# Allegro board demo_ver_17p2.brd
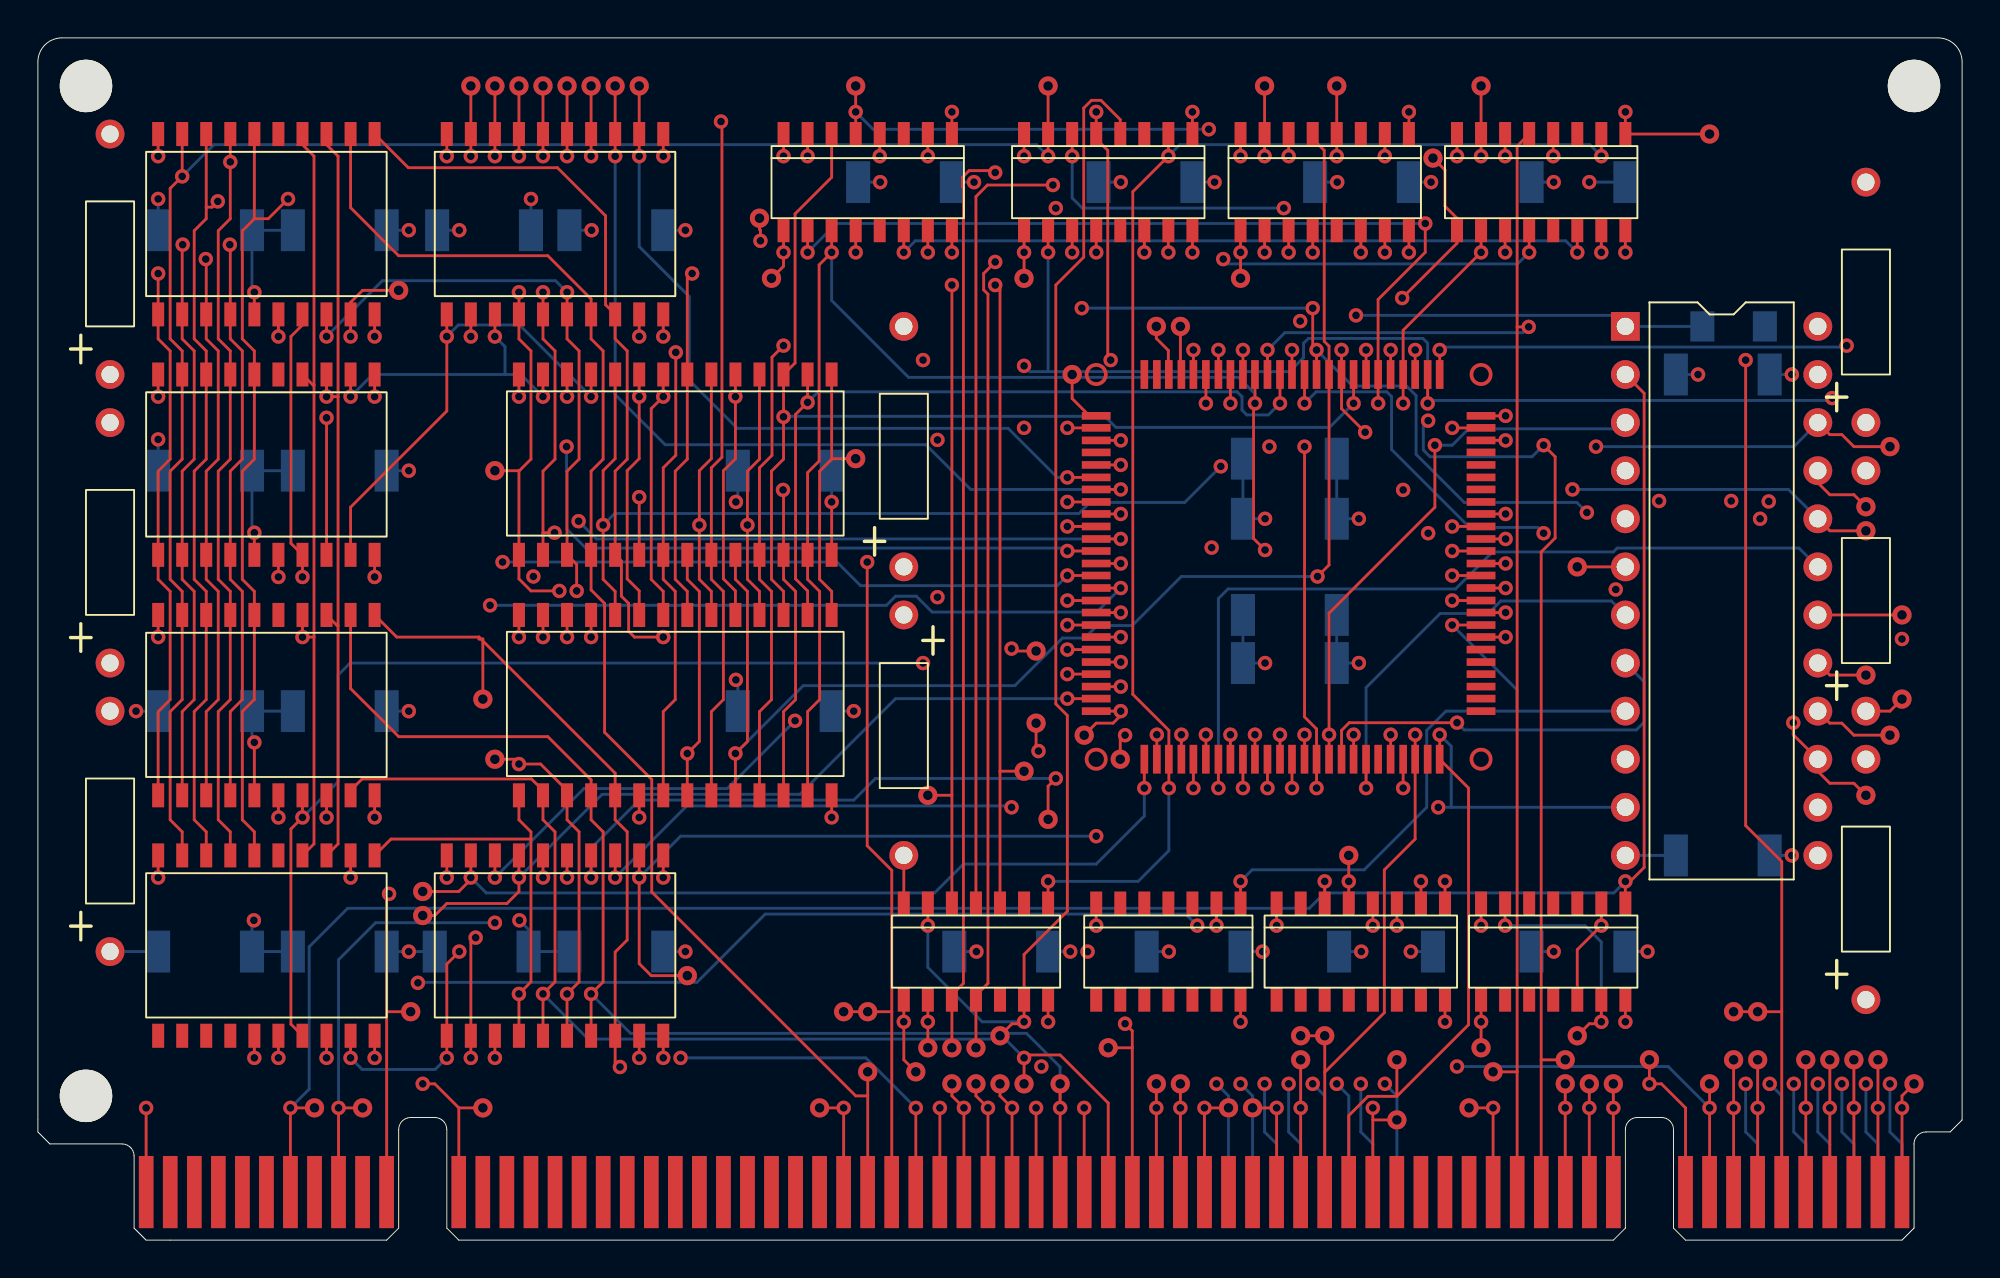
[diagram p0: board, top side]
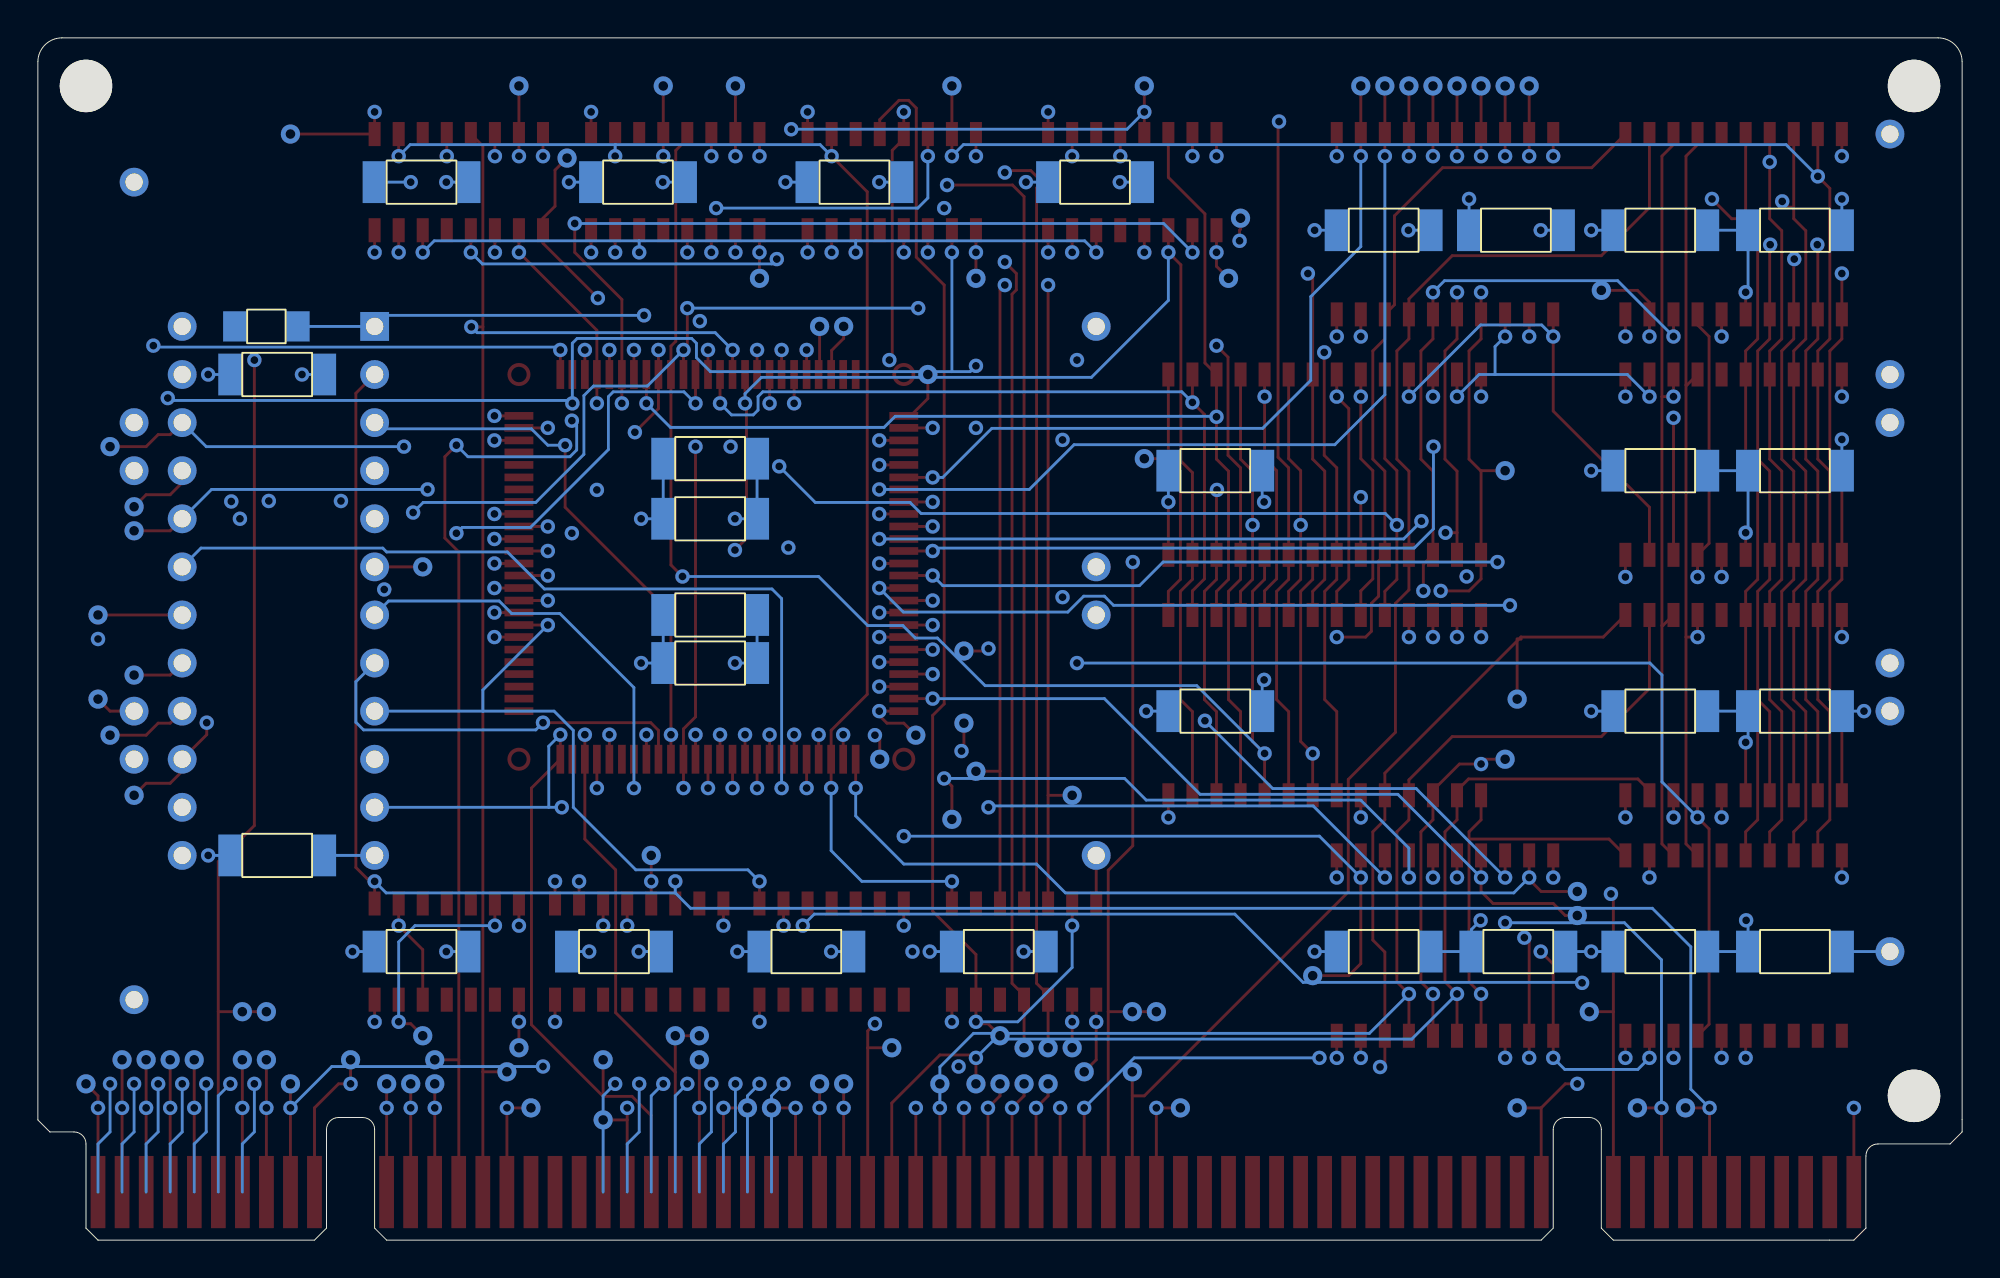
[diagram p1: board, bottom side, seen from below]

Outline 101.6 x 63.5 mm; copper layers: TOP, GND, IS3, IS4, VCC, BOTTOM. Coordinates in mm from the lower left corner of the outline.
Outline path: 0,62.23 arc(0.37,63.13) 1.27,63.5 100.33,63.5 arc(101.23,63.13) 101.6,62.23 101.6,6.35 100.97,5.71 99.7,5.71 arc(99.25,5.53) 99.06,5.08 99.06,0.63 98.43,0 87,0 86.36,0.63 86.36,5.84 arc(86.17,6.29) 85.73,6.48 84.46,6.48 arc(84.01,6.29) 83.82,5.84 83.82,0.63 83.19,0 22.22,0 21.59,0.63 21.59,5.84 arc(21.4,6.29) 20.95,6.48 19.68,6.48 arc(19.24,6.29) 19.05,5.84 19.05,0.63 18.41,0 5.71,0 5.08,0.63 5.08,4.45 arc(4.89,4.89) 4.45,5.08 0.64,5.08 0,5.71 0,62.23

## Design rules (mm)
constraint set DEFAULT: min track width 0.152

## Placement (name value [footprint] x y rotation side)
C1  0.01UF  [SMDCAP]  23.49 53.34 180 bottom
C2  0.01UF  [SMDCAP]  15.88 40.64 180 bottom
C3  0.01UF  [SMDCAP]  15.88 27.94 180 bottom
C4  0.01UF  [SMDCAP]  15.88 53.34 180 bottom
C5  0.01UF  [SMDCAP]  15.88 15.24 180 bottom
C6  0.01UF  [SMDCAP]  88.9 20.32 180 bottom
C7  0.01UF  [SMDCAP]  23.49 15.24 0 bottom
C8  0.01UF  [SMDCAP]  66.04 30.48 180 bottom
C9  0.01UF  [SMDCAP]  66.04 41.27 180 bottom
C10  0.01UF  [SMDCAP]  8.89 53.34 0 bottom
C11  0.01UF  [SMDCAP]  8.89 40.64 0 bottom
C12  0.01UF  [SMDCAP]  8.89 27.94 0 bottom
C13  0.01UF  [SMDCAP]  8.89 15.24 0 bottom
C14  0.01UF  [SMDCAP]  30.48 15.24 180 bottom
C15  0.01UF  [SMDCAP]  30.48 53.34 180 bottom
C16  0.01UF  [SMDCAP]  39.37 40.64 180 bottom
C17  0.01UF  [SMDCAP]  39.37 27.94 180 bottom
C18  0.01UF  [SMDCAP]  66.04 38.1 180 bottom
C19  0.01UF  [SMDCAP]  66.04 33.02 180 bottom
C20  0.01UF  [SMDCAP]  50.8 15.24 180 bottom
C21  0.022UF  [CAP400]  45.72 30.48 180 top
C22  0.022UF  [CAP400]  45.72 38.1 0 top
C23  0.022UF  [CAP400]  96.52 15.24 0 top
C24  0.022UF  [CAP400]  96.52 30.48 0 top
C25  0.022UF  [CAP400]  96.52 45.72 0 top
C26  0.022UF  [CAP400]  3.81 48.26 0 top
C27  0.022UF  [CAP400]  3.81 33.02 0 top
C28  0.022UF  [CAP400]  3.81 17.78 0 top
C29  1UF  [SMDCAP]  60.96 15.24 180 bottom
C30  1UF  [SMDCAP]  71.12 15.24 180 bottom
C31  1UF  [SMDCAP]  81.28 15.24 180 bottom
C32  1UF  [SMDCAP]  45.72 55.88 180 bottom
C33  1UF  [SMDCAP]  58.42 55.88 180 bottom
C34  1UF  [SMDCAP]  69.85 55.88 180 bottom
C35  1UF  [SMDCAP]  81.28 55.88 180 bottom
C36  1UF  [SMDCAP]  88.9 45.72 180 bottom
J1  -  [CONN140]  98.43 2.54 0 top
NOREF  -  [unnamed]  2.54 7.62 0 top
NOREF#2  -  [unnamed]  99.06 60.96 0 top
NOREF#3  -  [unnamed]  2.54 60.96 0 top
R1  10  [SMDRES]  89.54 48.26 180 bottom
U1  ***  [SOIC20W]  12.07 53.97 270 top
U2  ***  [SOIC20W]  12.07 41.27 270 top
U3  ***  [SOIC20W]  12.07 28.57 270 top
U4  ***  [SOIC20W]  12.07 15.88 270 top
U5  ***  [SOIC14]  59.69 15.24 270 top
U6  ***  [SOIC14]  49.53 15.24 270 top
U7  ***  [SOIC16]  69.85 15.24 270 top
U8  ***  [SOIC20W]  27.3 53.97 270 top
U9  ***  [SOIC20W]  27.3 15.88 270 top
U10  ***  [SOIC16]  43.81 55.88 270 top
U11  ***  [SOIC16]  79.38 55.88 270 top
U12  ***  [SOIC16]  56.52 55.88 270 top
U13  ***  [SOIC16]  67.95 55.88 270 top
U14  ***  [SOIC14]  80.01 15.24 270 top
U15  ***  [DIP24_4]  83.82 48.26 0 top
U16  ***  [SOIC28W]  33.66 41.27 270 top
U17  -  [FLAT100]  58.42 25.4 270 top
U18  ***  [SOIC28W]  33.66 28.57 270 top

## Library data of the parts
C1-C20 = CAP-.01UF: User Part Number: 1206; Tolerance: ***
C21-C28 = CAP-22UF: User Part Number: 21505-274-01; Tolerance: ***
C29-C36 = CAP-1UF: User Part Number: 21503-260-12; Tolerance: ***
J1 = CONN140-1
R1 = PRES-10: User Part Number: 24707-008-01; Tolerance: ***
U1-U4 = M5M44C256P-10-1
U5 = 74F04-1
U6 U14 = 74F393-1
U7 = 74F109-1
U8 U9 = 74F245-1
U10-U13 = 74F153-1
U15 = MEMPAL-1
U16 U18 = 27C256-1
U17 = I80386S-1

## Footprints (pads in the part's own frame, mm; a bottom-side part is the same pattern mirrored in y, then rotated)
CAP400
  round 1.524 hole 0.914: 1(0,-2.54) 2(0,10.16)
CONN140
  rect 0.762x3.81 smd: 1(0,0) 2(-1.27,0) 3(-2.54,0) 4(-3.81,0) 5(-5.08,0) 6(-6.35,0) 7(-7.62,0) 8(-8.89,0) 9(-10.16,0) 10(-11.43,0) 11(-15.24,0) 12(-16.51,0) 13(-17.78,0) 14(-19.05,0) 15(-20.32,0) 16(-21.59,0) 17(-22.86,0) 18(-24.13,0) 19(-25.4,0) 20(-26.67,0) 21(-27.94,0) 22(-29.21,0) 23(-30.48,0) 24(-31.75,0) 25(-33.02,0) 26(-34.29,0) 27(-35.56,0) 28(-36.83,0) 29(-38.1,0) 30(-39.37,0) 31(-40.64,0) 32(-41.91,0) 33(-43.18,0) 34(-44.45,0) 35(-45.72,0) 36(-46.99,0) 37(-48.26,0) 38(-49.53,0) 39(-50.8,0) 40(-52.07,0) 41(-53.34,0) 42(-54.61,0) 43(-55.88,0) 44(-57.15,0) 45(-58.42,0) 46(-59.69,0) 47(-60.96,0) 48(-62.23,0) 49(-63.5,0) 50(-64.77,0) 51(-66.04,0) 52(-67.31,0) 53(-68.58,0) 54(-69.85,0) 55(-71.12,0) 56(-72.39,0) 57(-73.66,0) 58(-74.93,0) 59(-76.2,0) 60(-80.01,0) 61(-81.28,0) 62(-82.55,0) 63(-83.82,0) 64(-85.09,0) 65(-86.36,0) 66(-87.63,0) 67(-88.9,0) 68(-90.17,0) 69(-91.44,0) 70(-92.71,0) 71(0,0) 72(-1.27,0) 73(-2.54,0) 74(-3.81,0) 75(-5.08,0) 76(-6.35,0) 77(-7.62,0) 78(-8.89,0) 79(-10.16,0) 80(-11.43,0) 81(-15.24,0) 82(-16.51,0) 83(-17.78,0) 84(-19.05,0) 85(-20.32,0) 86(-21.59,0) 87(-22.86,0) 88(-24.13,0) 89(-25.4,0) 90(-26.67,0) 91(-27.94,0) 92(-29.21,0) 93(-30.48,0) 94(-31.75,0) 95(-33.02,0) 96(-34.29,0) 97(-35.56,0) 98(-36.83,0) 99(-38.1,0) 100(-39.37,0) 101(-40.64,0) 102(-41.91,0) 103(-43.18,0) 104(-44.45,0) 105(-45.72,0) 106(-46.99,0) 107(-48.26,0) 108(-49.53,0) 109(-50.8,0) 110(-52.07,0) 111(-53.34,0) 112(-54.61,0) 113(-55.88,0) 114(-57.15,0) 115(-58.42,0) 116(-59.69,0) 117(-60.96,0) 118(-62.23,0) 119(-63.5,0) 120(-64.77,0) 121(-66.04,0) 122(-67.31,0) 123(-68.58,0) 124(-69.85,0) 125(-71.12,0) 126(-72.39,0) 127(-73.66,0) 128(-74.93,0) 129(-76.2,0) 130(-80.01,0) 131(-81.28,0) 132(-82.55,0) 133(-83.82,0) 134(-85.09,0) 135(-86.36,0) 136(-87.63,0) 137(-88.9,0) 138(-90.17,0) 139(-91.44,0) 140(-92.71,0)
DIP24_4
  rect 1.524x1.524 hole 0.914: 1(0,0)
  round 1.524 hole 0.914: 2(0,-2.54) 3(0,-5.08) 4(0,-7.62) 5(0,-10.16) 6(0,-12.7) 7(0,-15.24) 8(0,-17.78) 9(0,-20.32) 10(0,-22.86) 11(0,-25.4) 12(0,-27.94) 13(10.16,-27.94) 14(10.16,-25.4) 15(10.16,-22.86) 16(10.16,-20.32) 17(10.16,-17.78) 18(10.16,-15.24) 19(10.16,-12.7) 20(10.16,-10.16) 21(10.16,-7.62) 22(10.16,-5.08) 23(10.16,-2.54) 24(10.16,0)
FLAT100
  rect 1.524x0.406 smd: 1(0,0) 2(0,0.66) 3(0,1.295) 4(0,1.956) 5(0,2.591) 6(0,3.251) 7(0,3.912) 8(0,4.547) 9(0,5.207) 10(0,5.842) 11(0,6.502) 12(0,7.163) 13(0,7.798) 14(0,8.458) 15(0,9.093) 16(0,9.754) 17(0,10.414) 18(0,11.049) 19(0,11.709) 20(0,12.344) 21(0,13.005) 22(0,13.665) 23(0,14.3) 24(0,14.961) 25(0,15.596) 51(-20.32,15.596) 52(-20.32,14.961) 53(-20.32,14.3) 54(-20.32,13.665) 55(-20.32,13.005) 56(-20.32,12.344) 57(-20.32,11.709) 58(-20.32,11.049) 59(-20.32,10.414) 60(-20.32,9.754) 61(-20.32,9.093) 62(-20.32,8.458) 63(-20.32,7.798) 64(-20.32,7.163) 65(-20.32,6.502) 66(-20.32,5.842) 67(-20.32,5.207) 68(-20.32,4.547) 69(-20.32,3.912) 70(-20.32,3.251) 71(-20.32,2.591) 72(-20.32,1.956) 73(-20.32,1.295) 74(-20.32,0.66) 75(-20.32,0)
  rect 0.406x1.524 smd: 26(-2.54,17.78) 27(-3.2,17.78) 28(-3.835,17.78) 29(-4.496,17.78) 30(-5.131,17.78) 31(-5.791,17.78) 32(-6.452,17.78) 33(-7.087,17.78) 34(-7.747,17.78) 35(-8.382,17.78) 36(-9.042,17.78) 37(-9.703,17.78) 38(-10.338,17.78) 39(-10.998,17.78) 40(-11.633,17.78) 41(-12.294,17.78) 42(-12.954,17.78) 43(-13.589,17.78) 44(-14.249,17.78) 45(-14.884,17.78) 46(-15.545,17.78) 47(-16.205,17.78) 48(-16.84,17.78) 49(-17.501,17.78) 50(-18.136,17.78) 76(-18.136,-2.54) 77(-17.501,-2.54) 78(-16.84,-2.54) 79(-16.205,-2.54) 80(-15.545,-2.54) 81(-14.884,-2.54) 82(-14.249,-2.54) 83(-13.589,-2.54) 84(-12.954,-2.54) 85(-12.294,-2.54) 86(-11.633,-2.54) 87(-10.998,-2.54) 88(-10.338,-2.54) 89(-9.703,-2.54) 90(-9.042,-2.54) 91(-8.382,-2.54) 92(-7.747,-2.54) 93(-7.087,-2.54) 94(-6.452,-2.54) 95(-5.791,-2.54) 96(-5.131,-2.54) 97(-4.496,-2.54) 98(-3.835,-2.54) 99(-3.2,-2.54) 100(-2.54,-2.54)
SMDCAP
  rect 1.27x2.21 smd: 1(-2.54,0) 2(2.413,0)
SMDRES
  rect 1.27x1.6 smd: 1(-1.651,0) 2(1.651,0)
SOIC14
  rect 1.27x0.635 smd: 1(-2.54,3.81) 2(-2.54,2.54) 3(-2.54,1.27) 4(-2.54,0) 5(-2.54,-1.27) 6(-2.54,-2.54) 7(-2.54,-3.81) 8(2.54,-3.81) 9(2.54,-2.54) 10(2.54,-1.27) 11(2.54,0) 12(2.54,1.27) 13(2.54,2.54) 14(2.54,3.81)
SOIC16
  rect 1.27x0.635 smd: 1(-2.54,4.445) 2(-2.54,3.175) 3(-2.54,1.905) 4(-2.54,0.635) 5(-2.54,-0.635) 6(-2.54,-1.905) 7(-2.54,-3.175) 8(-2.54,-4.445) 9(2.54,-4.445) 10(2.54,-3.175) 11(2.54,-1.905) 12(2.54,-0.635) 13(2.54,0.635) 14(2.54,1.905) 15(2.54,3.175) 16(2.54,4.445)
SOIC20W
  rect 1.27x0.635 smd: 1(-4.445,5.715) 2(-4.445,4.445) 3(-4.445,3.175) 4(-4.445,1.905) 5(-4.445,0.635) 6(-4.445,-0.635) 7(-4.445,-1.905) 8(-4.445,-3.175) 9(-4.445,-4.445) 10(-4.445,-5.715) 11(5.08,-5.715) 12(5.08,-4.445) 13(5.08,-3.175) 14(5.08,-1.905) 15(5.08,-0.635) 16(5.08,0.635) 17(5.08,1.905) 18(5.08,3.175) 19(5.08,4.445) 20(5.08,5.715)
SOIC28W
  rect 1.27x0.635 smd: 1(-4.445,8.255) 2(-4.445,6.985) 3(-4.445,5.715) 4(-4.445,4.445) 5(-4.445,3.175) 6(-4.445,1.905) 7(-4.445,0.635) 8(-4.445,-0.635) 9(-4.445,-1.905) 10(-4.445,-3.175) 11(-4.445,-4.445) 12(-4.445,-5.715) 13(-4.445,-6.985) 14(-4.445,-8.255) 15(5.08,-8.255) 16(5.08,-6.985) 17(5.08,-5.715) 18(5.08,-4.445) 19(5.08,-3.175) 20(5.08,-1.905) 21(5.08,-0.635) 22(5.08,0.635) 23(5.08,1.905) 24(5.08,3.175) 25(5.08,4.445) 26(5.08,5.715) 27(5.08,6.985) 28(5.08,8.255)
unnamed
  round 2.769 hole 2.769 unplated: (0,0)

## Nets
GND: C1.2(B<0>) C2.2(B<0>) C3.2(B<0>) C4.2(B<0>) C5.2(B<0>) C6.2(B<0>) C7.2(B<0>) C8.2(B<0>) C9.2(B<0>) C10.2(B<0>) C11.2(B<0>) C12.2(B<0>) C13.2(B<0>) C14.2(B<0>) C15.2(B<0>) C16.2(B<0>) C17.2(B<0>) C18.2(B<0>) C19.2(B<0>) C20.2(B<0>) C21.2(B<0>) C22.2(B<0>) C23.2(B<0>) C24.2(B<0>) C25.2(B<0>) C26.2(B<0>) C27.2(B<0>) C28.2(B<0>) C29.2(B<0>) C30.2(B<0>) C31.2(B<0>) C32.2(B<0>) C33.2(B<0>) C34.2(B<0>) C35.2(B<0>) C36.2(B<0>) J1.90 J1.91 J1.92 J1.93 J1.94 J1.95 J1.96 J1.97 U1.15 U1.16 U1.20 U2.15 U2.16 U2.20 U3.15 U3.16 U3.20 U4.15 U4.16 U4.20 U5.7 U6.7 U7.3 U7.8 U8.10 U8.19 U9.10 U9.19 U10.1 U10.8 U10.15 U11.1 U11.8 U11.15 U12.1 U12.8 U12.15 U13.1 U13.8 U13.15 U14.7 U15.12 U15.13 U16.14 U16.20 U17.2 U17.5 U17.11 U17.12 U17.13 U17.14 U17.22 U17.35 U17.37 U17.38 U17.40 U17.41 U17.49 U17.50 U17.63 U17.67 U17.68 U17.77 U17.78 U17.85 U17.98 U18.14 U18.20
VCC: C1.1 C2.1 C3.1 C4.1 C5.1 C6.1 C7.1 C8.1 C9.1 C10.1 C11.1 C12.1 C13.1 C14.1 C15.1 C16.1 C17.1 C18.1 C19.1 C20.1 C21.1 C22.1 C23.1 C24.1 C25.1 C26.1 C27.1 C28.1 C29.1 C30.1 C31.1 C32.1 C33.1 C34.1 C35.1 C36.1 J1.70 J1.71 J1.72 J1.73 J1.74 J1.75 J1.76 J1.77 U1.10 U2.10 U3.10 U4.10 U5.14 U6.14 U7.1 U7.2 U7.16 U8.20 U9.20 U10.16 U11.16 U12.16 U13.16 U14.14 U15.24 U16.28 U17.6 U17.8 U17.9 U17.10 U17.21 U17.32 U17.34 U17.36 U17.39 U17.42 U17.48 U17.57 U17.69 U17.71 U17.84 U17.91 U17.97 U18.28
A1: J1.2 U13.10 U16.10 U17.18 U18.10
A2: J1.3 U13.6 U16.9 U17.51 U18.9
A3: J1.4 U12.10 U16.8 U17.52 U18.8
A4: J1.5 U12.6 U16.7 U17.53 U18.7
A5: J1.6 U11.10 U16.6 U17.54 U18.6
A6: J1.7 U11.6 U16.5 U17.55 U18.5
A7: J1.8 U10.10 U16.4 U17.56 U18.4
A8: J1.9 U10.6 U16.3 U17.58 U18.3
A9: J1.10 U13.11 U16.25 U17.59 U18.25
A10: J1.11 U13.5 U16.24 U17.60 U18.24
A11: J1.12 U12.11 U16.21 U17.61 U18.21
A12: J1.13 U12.5 U16.23 U17.62 U18.23
A13: J1.14 U11.11 U16.2 U17.64 U18.2
A14: J1.15 U11.5 U16.26 U17.65 U18.26
A15: J1.16 U10.11 U16.27 U17.66 U18.27
A16: U10.5 U17.70
A17: U17.72
A18: U17.73
A19: U17.74
A20: U17.75
A21: U17.76
A22: U17.79
A23: U15.6 U17.80
ADDR0: U1.6 U2.6 U3.6 U4.6 U13.9(Y<0>)
ADDR1: U1.7 U2.7 U3.7 U4.7 U13.7
ADDR2: U1.8 U2.8 U3.8 U4.8 U12.9(Y<0>)
ADDR3: U1.9 U2.9 U3.9 U4.9 U12.7
ADDR4: U1.11 U2.11 U3.11 U4.11 U11.9(Y<0>)
ADDR5: U1.12 U2.12 U3.12 U4.12 U11.7
ADDR6: U1.13 U2.13 U3.13 U4.13 U10.9(Y<0>)
ADDR7: U1.14 U2.14 U3.14 U4.14 U10.7
ADSL: J1.24 U15.3 U17.16
BHEL: J1.21 U15.7 U17.19
BLEL: J1.1(P<0>) U15.8 U17.17
CAS0L: U3.17 U4.17 U15.17
CAS1L: U1.17 U2.17 U15.18
CLK2: J1.62 R1.2(B<0>) U7.4 U15.1 U17.15
CLRCNT: U14.2 U14.12 U15.21
D0: U9.9 U17.1
D1: U9.8 U17.100
D2: U9.7 U17.99
D3: U9.6 U17.96
D4: U9.5 U17.95
D5: U9.4 U17.94
D6: U9.3 U17.93
D7: U9.2 U17.92
D8: U8.9 U17.90
D9: U8.8 U17.89
D10: U8.7 U17.88
D11: U8.6 U17.87
D12: U8.5 U17.86
D13: U8.4 U17.83
D14: U8.3 U17.82
D15: U8.2 U17.81
DATA0: J1.28 U4.19(DQ<0>) U9.11(B<0>) U18.11
DATA1: J1.29 U4.18 U9.12 U18.12
DATA2: J1.30 U4.2 U9.13 U18.13
DATA3: J1.31 U4.1 U9.14 U18.15
DATA4: J1.32 U3.19(DQ<0>) U9.15 U18.16
DATA5: J1.33 U3.18 U9.16 U18.17
DATA6: J1.34 U3.2 U9.17 U18.18
DATA7: J1.35 U3.1 U9.18 U18.19
DATA8: J1.36 U2.19(DQ<0>) U8.11(B<0>) U16.11
DATA9: J1.37 U2.18 U8.12 U16.12
DATA10: J1.38 U2.2 U8.13 U16.13
DATA11: J1.39 U2.1 U8.14 U16.15
DATA12: J1.40 U1.19(DQ<0>) U8.15 U16.16
DATA13: J1.41 U1.18 U8.16 U16.17
DATA14: J1.42 U1.2 U8.17 U16.18
DATA15: J1.43 U1.1 U8.18 U16.19
HLDA: J1.25 U6.1 U10.2 U11.2 U12.2 U13.2 U15.4 U17.3
MIO: J1.23 U15.5 U17.23
MUXS0L: U10.14 U11.14 U12.14 U13.14 U15.20
PCLK: J1.64 U7.6 U14.1 U15.2
RA0: U6.3 U13.12
RA1: U6.4 U13.4
RA2: U6.5 U12.12
RA3: U6.6 U6.13 U12.4
RA4: U6.11 U11.12
RA5: U6.10 U11.4
RA6: U6.9 U10.12
RA7: U6.8(Q<3>) U10.4
RASL: U1.4 U2.4 U3.4 U4.4 U15.16
RDYL: J1.60 U15.19 U17.7
REF: U14.8(Q<3>) U15.10 U17.4
RESET: J1.59 U5.1 U15.9 U17.33(RESET)
RESETL: U5.2 U7.5
ROMOEL: U15.15 U16.22 U18.22
UN1F39330PQ0: U14.6 U14.13
UN1OSC1PB0: R1.1
UN127C25637PVPP0: U16.1(VPP) U18.1(VPP)
WEL: U1.3 U2.3 U3.3 U4.3 U15.22
WR: J1.22 U8.1 U9.1 U15.11(I<9>) U17.25

Pads without a net: J1 17 18 19 20 26 27 44 45 46 47 48 49 50 51 52 53 54 55 56 57 58 61 63 65 66 67 68 69 78 79 80 81 82 83 84 85 86 87 88 89 98 99 100 101 102 103 104 105 106 107 108 109 110 111 112 113 114 115 116 117 118 119 120 121 122 123 124 125 126 127 128 129 130 131 132 133 134 135 136 137 138 139 140; U1 5; U2 5; U3 5; U4 5; U5 3 4 5 6 8 9 10 11 12 13; U6 2 12; U7 7 9 10 11 12 13 14 15; U10 3 13; U11 3 13; U12 3 13; U13 3 13; U14 3 4 5 9 10 11; U15 14 23; U17 20 24 26 27 28 29 30 31 43 44 45 46 47

## Via types
v1: diameter 0.762, hole 0.406, TOP to BOTTOM, 426 vias
v2: diameter 1.016, hole 0.508, TOP to BOTTOM, 94 vias

## Routing (per net, layer and track width the routed paths; a pad name or vN(x,y) marks a point on that pad's centre or on a via; arc(x,y) is an arc through that point)
GND: length 180.1
  TOP w0.152: v1(21.59,57.25) U8.10 ; v1(61.01,23.88) U17.5 ; v1(25.4,31.85) U18.14 ; v1(39.37,57.25) U10.8 ; v1(12.7,35.03) U2.16 ; v1(25.4,44.55) U16.14 ; U12.1 v1(60.96,59.59) ; v1(65.41,16.61) U7.8 ; U2.15 v1(11.43,37.36) ; v1(12.7,47.73) U1.16 ; v1(74.68,33.78) U17.35 ; v1(21.59,19.15) U9.10 ; v1(46.99,52.17) U10.15 ; v1(12.7,22.33) 12.7,23.5 ; v1(83.82,59.59) U11.1 v2(88.27,58.42) ; U17.38 v1(77.5,35.74) ; v1(55.88,16.61) U5.7 ; v1(62.97,44.2) U17.68 ; v1(12.7,9.63) U4.16 ; v1(64.92,23.88) U17.11 ; U16.20 v1(31.75,39.24) ; U17.50 v1(77.5,43.54) ; U1.15 v1(11.43,50.06) ; v1(74.68,37.69) U17.41 ; v1(63.5,57.25) U13.8 ; U6.7 C21.2 ; v1(76.2,16.61) U14.7 ; U13.1 v1(72.39,59.59) ; v1(74.68,35.1) U17.37 ; v1(54.36,42.9) U17.77 ; v1(17.78,47.73) U1.20 ; U17.98 v1(57.18,29.24) ; v1(11.43,9.63) U4.15 ; v1(72.09,23.88) U17.22 ; v1(31.75,9.63) U9.19 ; v1(54.36,37.69) U17.85 ; v1(74.68,42.9) U17.49 ; v1(17.78,35.03) U2.20 ; v1(17.78,9.63) U4.20 ; U17.14 v1(66.88,26.7) ; v1(74.93,57.25) U11.8 ; v1(59.69,52.17) U12.15 ; v1(71.12,52.17) U13.15 ; U10.1 v1(48.26,59.59) ; v1(31.75,47.73) U8.19 ; v1(31.75,22.33) 31.75,23.5 ; U17.78 v1(57.18,42.24) ; U17.12 v1(65.58,26.7) ; U17.2 v1(59.08,26.7) ; v1(71.76,16.61) U7.3 ; v1(82.55,52.17) U11.15 ; U17.67 v1(63.63,47.02) ; U17.63 v1(66.22,47.02) ; v1(52.07,57.25) U12.8 ; v1(66.22,23.88) U17.13 ; v1(17.78,22.33) 17.78,23.5 ; U17.40 v1(77.5,37.03) ; 11.43,23.5 v1(11.43,26.29)
  GND w0.152: v1(36.86,29.59) 36.96,29.59 ; 11.3,16.89 v1(11.4,16.89) ; v1(36.86,38.99) 36.96,38.99
  BOTTOM w0.152: C14.2 C7.2 25.91,16.41 v1(25.43,16.89) ; v1(63.5,8.26) 64.14,7.62 J1.96 ; C4.2 C10.2 11.3,50.19 v1(11.43,50.06) ; C34.2 v1(68.61,55.88) ; C33.2 v1(57.18,55.88) ; J1.97 62.87,7.62 v1(62.23,8.26) ; J1.94 66.68,5.08 66.04,5.71 v1(66.04,8.26) ; C9.2 C18.2 v1(64.8,38.1) ; C16.2 36.96,39.09 v1(36.86,38.99) ; C20.2 v1(49.56,15.24) ; C17.2 36.96,29.49 v1(36.86,29.59) ; J1.95 65.41,5.08 64.77,5.71 v1(64.77,8.26) ; J1.92 69.22,7.62 v1(68.58,8.26) ; C30.2 v1(69.88,15.24) ; C32.2 v1(44.48,55.88) ; C5.2 C13.2 11.3,16.79 v1(11.4,16.89) ; 70.48,2.54 70.48,5.08 69.85,5.71 v1(69.85,8.26) ; v1(67.31,8.26) 67.95,7.62 J1.93 ; C1.2 v1(22.25,53.34) ; C31.2 v1(80.04,15.24) ; C15.2 v1(29.24,53.34) ; v1(11.43,26.29) 11.3,26.42 C12.2 C3.2 ; U15.12 C6.2 ; J1.90 71.76,7.62 v1(71.12,8.26) ; v1(11.43,37.36) 11.3,37.49 C11.2 C2.2 ; v1(64.8,30.48) C8.2 C19.2 ; C29.2 v1(59.72,15.24) ; C36.2 v1(87.66,45.72) ; C35.2 v1(80.04,55.88)
VCC: length 134.4
  TOP w0.152: v1(83.82,11.53) U14.14 ; v1(72.39,52.17) U13.16 ; U17.8 v1(62.97,26.7) ; v1(6.35,19.15) U4.10 ; U7.1 v1(74.3,18.95) ; U17.36 v1(77.5,34.44) ; v1(60.96,52.17) U12.16 ; v1(63.63,23.88) U17.9 ; U17.69 v1(62.33,47.02) ; C24.1 97.79,27.94 v2(98.43,28.57) ; v1(6.35,57.25) U1.10 ; U17.6 v1(61.67,26.7) ; U17.10 v1(64.26,26.7) ; v1(63.5,11.53) U5.14 ; U17.48 v1(77.5,42.24) ; v1(54.36,33.78) U17.91 ; U17.34 v1(77.5,33.15) ; v1(53.34,11.53) U6.14 ; v1(74.68,36.4) U17.39 ; v1(41.91,22.33) 41.91,23.5 ; v1(6.35,44.55) U2.10 ; v1(48.26,52.17) U10.16 ; v1(33.02,47.73) U8.20 ; U17.32 v1(77.5,31.85) ; v1(54.36,29.9) U17.97 ; v1(6.35,31.85) U3.10 ; U17.21 v1(71.42,26.7) ; U17.42 v1(77.5,38.35) ; U7.2 v1(73.03,18.95) ; U17.57 v1(70.13,47.02) ; v1(74.3,11.53) U7.16 ; v1(83.82,52.17) U11.16 ; U17.71 v1(61.01,47.02) ; U16.28 v1(41.91,38.99) ; v1(33.02,9.63) U9.20 ; J1.70 v1(5.71,6.99) ; U17.84 v1(57.18,38.35)
  BOTTOM w0.152: J1.77 90.81,5.08 90.17,5.71 v1(90.17,8.26) ; v1(41.91,38.99) C16.1 ; J1.73 95.89,5.08 95.25,5.71 v1(95.25,8.26) ; C15.1 v1(34.19,53.34) ; J1.74 94.62,5.08 93.98,5.71 v1(93.98,8.26) ; v1(5.18,27.94) C12.1 ; v1(96.52,8.26) 96.52,5.71 97.16,5.08 J1.72 ; C20.1 v1(54.51,15.24) ; C6.1 v1(92.61,20.32) ; C33.1 v1(62.13,55.88) ; C28.1 C13.1 ; v1(97.79,8.26) 97.79,5.71 98.43,5.08 J1.71 ; 26.04,53.34 v1(26.04,54.99) ; v1(72.49,15.24) C30.1 ; C2.1 v1(19.58,40.64) ; C34.1 v1(73.56,55.88) ; C9.1 C18.1 v1(69.75,38.1) ; v1(92.71,8.26) 92.71,5.71 93.35,5.08 J1.75 ; C11.1 v1(6.35,42.29) ; C14.1 v1(34.19,15.24) ; C36.1 v1(92.61,45.72) ; C4.1 v1(19.58,53.34) ; C7.1 v1(19.58,15.24) C5.1 ; J1.76 92.08,7.62 v1(91.44,8.26) ; v1(69.75,30.48) C8.1 C19.1 ; C32.1 v1(49.43,55.88) ; C10.1 v1(6.35,54.99) ; C17.1 v1(43.08,27.94) ; C3.1 v1(19.58,27.94) ; C31.1 v1(84.99,15.24) ; v1(81.92,55.88) C35.1 ; C29.1 v1(64.67,15.24)
A1: length 135.3
  TOP w0.152: U18.10 30.48,34.26 29.84,34.9 v1(29.84,37.77) 29.84,40.64 30.48,41.27 U16.10 ; J1.2 v1(97.16,6.99) v2(97.16,9.53) ; v1(64.77,52.17) U13.10 ; U17.18 v1(69.47,26.7)
  IS3 w0.152: v1(97.16,6.99) 97.16,8.48 97.46,8.79 97.46,25.83 96.95,26.34 83.41,26.34 83.16,26.09 70.08,26.09 v1(69.47,26.7)
  IS4 w0.152: v1(69.47,26.7) 66.27,29.9 66.27,40.87 ; v1(62.46,40.87) 66.27,40.87 ; 66.27,40.87 66.27,46.1 65.61,46.76 65.61,51.33 v1(64.77,52.17)
  BOTTOM w0.152: v1(62.46,40.87) 60.55,38.96 55.55,38.96 54.97,38.38 30.45,38.38 v1(29.84,37.77)
A2: length 144.1
  TOP w0.152: v2(95.89,9.53) v1(95.89,6.99) J1.3 ; v1(66.04,57.25) U13.6 ; U18.9 31.75,34.29 31.11,34.92 31.11,40.64 31.75,41.27 v1(31.75,44.55) U16.9 ; U17.51 v1(74.02,47.02)
  IS3 w0.152: 70.74,47.93 70.74,46.66 70.48,46.41 68.58,46.41 68.12,46.86 68.12,47.37 67.87,47.62 49.12,47.62 47.35,45.85 33.05,45.85 v1(31.75,44.55) ; 70.74,47.93 73.1,47.93 v1(74.02,47.02) ; 70.74,47.93 70.66,47.93 70.36,48.23 66.95,48.23 v1(66.65,48.54)
  IS4 w0.152: v1(66.04,57.25) 66.65,56.64 v1(66.65,48.54) ; v1(95.5,47.24) 95.5,12.37 95.89,11.99 v1(95.89,6.99)
  BOTTOM w0.152: v1(95.5,47.24) 95.43,47.17 74.17,47.17 v1(74.02,47.02)
A3: length 133.9
  TOP w0.152: U16.8 v1(33.02,44.55) 32.38,43.92 32.38,34.9 33.02,34.26 U18.8 ; v1(73.38,44.2) U17.52 ; v2(94.62,9.53) v1(94.62,6.99) J1.4 ; v1(53.34,52.17) U12.10
  IS3 w0.152: v1(33.02,44.55) 34.01,45.54 51.44,45.54 v1(52.07,46.18)
  IS4 w0.152: v1(94.74,44.48) 94.92,44.3 94.92,19.91 94.62,19.61 v1(94.62,6.99)
  BOTTOM w0.152: v1(52.07,46.18) 52.37,45.87 53.34,45.87 ; 73.38,44.35 v1(73.38,44.2) ; 73.38,44.35 73.38,47.37 73.13,47.62 67.08,47.62 66.83,47.37 66.83,46.61 66.09,45.87 53.34,45.87 ; 73.38,44.35 94.62,44.35 v1(94.74,44.48) ; 53.34,45.87 v1(53.34,52.17)
A4: length 147.9
  TOP w0.152: v2(93.35,9.53) v1(93.35,6.99) J1.5 ; U17.53 v1(72.72,47.02) ; v1(34.54,51.05) 34.29,50.8 U16.7 34.29,41.25 33.66,40.61 33.66,34.9 34.29,34.26 U18.7 ; v1(54.61,57.25) U12.6
  IS3 w0.152: 66.65,53.9 71.53,53.9 74.78,50.65 74.78,46.89 74.3,46.41 ; 66.65,53.9 66.4,53.9 v1(65.79,54.51) ; 66.65,53.9 66.65,51.82 65.89,51.05 v1(34.54,51.05) ; v1(72.72,47.02) 73.33,46.41 74.3,46.41 ; 74.3,46.41 74.3,45.82 74.7,45.42 82.63,45.42 83.29,44.75 88.19,44.75 91.39,41.55 v1(91.39,39.01)
  IS4 w0.152: v1(91.39,39.01) 92,38.4 92,9.88 93.35,8.53 v1(93.35,6.99)
  BOTTOM w0.152: v1(54.61,57.25) 54.61,55.04 55.14,54.51 v1(65.79,54.51)
A5: length 130.2
  TOP w0.152: 92.08,12.07 92.08,19.99 90.17,21.89 v1(90.17,46.48) ; 92.08,12.07 J1.6 ; 92.08,12.07 v2(90.81,12.07) v2(89.54,12.07) ; U11.10 v1(76.2,52.17) 72.09,48.06 U17.54 v1(72.09,44.2) ; U16.6 35.56,41.27 34.92,40.64 v1(34.92,37.77) 34.92,34.9 35.56,34.26 U18.6
  IS3 w0.152: v1(90.17,46.48) 89.79,46.86 81.51,46.86 v1(76.2,52.17) ; v1(34.92,37.77) 35.53,38.38 56.34,38.38 56.92,38.96 71.42,38.96 v1(72.09,39.62)
  IS4 w0.152: v1(72.09,39.62) v1(72.09,44.2)
A6: length 130
  TOP w0.152: J1.7 v1(90.81,6.99) v2(90.81,9.53) ; U16.5 v1(36.83,44.55) 36.83,41.27 36.2,40.64 36.2,34.92 36.83,34.29 U18.5 ; v1(77.47,57.25) U11.6 ; U17.55 v1(71.42,47.02)
  IS3 w0.152: 71.42,45.11 68.73,45.11 67.21,43.59 66.45,43.59 66.19,43.84 66.19,44.6 65.94,44.86 37.13,44.86 v1(36.83,44.55) ; 71.42,45.11 81.92,45.11 82.58,44.45 87.12,44.45 90.32,41.25 90.32,38.71 v1(90.93,38.1) ; 71.42,45.11 v1(71.42,47.02)
  IS4 w0.152: v1(90.81,6.99) 90.81,37.97 v1(90.93,38.1) ; v1(77.47,57.25) 76.81,56.59 76.81,50.16 74.27,47.62 72.03,47.62 v1(71.42,47.02)
A7: length 134.3
  TOP w0.152: v1(70.76,44.2) U17.56 70.76,49.68 73.25,52.17 v1(73.25,53.7) ; U16.4 38.1,41.25 37.46,40.61 v1(37.46,37.77) 37.46,34.9 38.1,34.26 U18.4 ; v2(89.54,9.53) v1(89.54,6.99) J1.8 ; v1(40.64,52.17) U10.10
  IS3 w0.152: v1(70.76,44.2) 71.37,44.81 73.63,44.81 74.3,44.15 84.3,44.15 v1(89.41,39.04)
  IS4 w0.152: v1(37.46,37.77) 37.46,49 v1(40.64,52.17) ; v1(89.54,6.99) 89.54,38.91 v1(89.41,39.04)
  BOTTOM w0.152: v1(40.64,52.17) 42.16,53.7 v1(73.25,53.7)
A8: length 116.9
  TOP w0.152: U18.3 39.37,34.26 38.73,34.9 38.73,40.61 39.37,41.25 v1(39.37,43.48) U16.3 39.98,46.33 39.98,54.2 41.91,56.13 U10.6 ; v2(88.27,8.26) v1(88.27,6.99) 88.27,2.54 ; v1(69.47,44.2) U17.58
  IS4 w0.152: v1(74.93,9.17) 74.93,22.91 72.03,25.81 72.03,26.97 69.14,29.87 69.14,43.87 v1(69.47,44.2)
  BOTTOM w0.152: v1(88.27,6.99) 86.08,9.17 v1(74.93,9.17) ; v1(69.47,44.2) 68.2,42.93 56.92,42.93 56.34,43.51 39.4,43.51 v1(39.37,43.48)
A9: length 126.3
  TOP w0.152: J1.10 87,6.99 85.73,8.26 v1(85.09,8.26) v2(85.09,9.53) ; v1(68.83,47.02) U17.59 68.83,43.92 v1(70.08,42.67) ; v1(39.37,47.24) 38.76,46.63 38.76,41.45 38.1,40.79 U16.25 38.1,34.9 38.73,34.26 38.73,28.55 38.1,27.91 38.1,23.5 ; v1(66.04,52.17) U13.11
  IS3 w0.152: v1(85.6,39.04) 83.9,39.04 82.88,40.06 82.88,42.34 82.37,42.85 75.49,42.85 74.93,42.29 74.32,42.29 73.94,42.67 v1(70.08,42.67) ; v1(39.37,47.24) 46.23,47.24 46.91,47.93 68.28,47.93 68.83,47.37 v1(68.83,47.02)
  IS4 w0.152: v1(85.6,39.04) 85.6,8.76 v1(85.09,8.26) ; v1(66.04,52.17) 66.04,48.29 66.7,47.62 68.22,47.62 v1(68.83,47.02)
A10: length 121.7
  TOP w0.152: 36.83,23.5 v1(36.83,25.7) 37.46,26.34 37.46,34.26 36.83,34.9 U16.24 ; v2(83.19,8.26) v1(83.19,6.99) 83.19,2.54 ; U13.5 67.31,58.17 67.92,57.56 67.92,47.47 68.17,47.22 U17.60 68.17,35.66 v1(67.56,35.05)
  IS3 w0.152: v1(83.31,34.37) 82.78,33.83 76.89,33.83 76.33,34.39 68.22,34.39 v1(67.56,35.05)
  IS4 w0.152: v1(83.19,6.99) 83.19,17.22 82.88,17.53 82.88,33.93 v1(83.31,34.37)
  BOTTOM w0.152: v1(67.56,35.05) 60.38,35.05 57.78,32.46 55.93,32.46 55.27,31.8 54.1,31.8 51.59,29.29 40.41,29.29 v1(36.83,25.7)
A11: length 123.6
  TOP w0.152: 33.02,23.5 33.02,27.91 33.66,28.55 33.66,34.26 33.02,34.9 U16.21 33.02,40.79 33.68,41.45 v1(33.68,46.89) ; v2(81.92,8.26) v1(81.92,6.99) J1.12 ; v1(67.31,49.23) 67.31,47.22 v1(67.51,47.02) U17.61 ; v1(54.61,52.17) U12.11
  IS3 w0.152: v1(55.12,49.23) 36.02,49.23 v1(33.68,46.89)
  IS4 w0.152: v1(81.79,38.43) 81.92,38.3 v1(81.92,6.99) ; v1(54.61,52.17) 55.12,51.66 v1(55.12,49.23)
  BOTTOM w0.152: v1(67.51,47.02) 69.42,45.11 72.26,45.11 72.77,44.6 72.77,41.5 75.31,38.96 81.25,38.96 v1(81.79,38.43) ; v1(55.12,49.23) v1(67.31,49.23)
A12: length 137
  TOP w0.152: v1(56.64,46.48) 56.49,46.63 56.49,57.56 55.88,58.17 U12.5 v1(55.88,59.59) ; v1(36.07,59.08) 36.12,59.03 36.12,41.35 35.56,40.79 U16.23 35.56,34.9 36.2,34.26 36.2,28.55 35.56,27.91 35.56,23.5 ; v2(80.65,8.26) v1(80.65,6.99) J1.13 ; v1(66.88,44.2) U17.62
  IS3 w0.152: v1(36.07,59.08) 36.17,58.98 55.27,58.98 v1(55.88,59.59) ; v1(56.64,46.48) 56.72,46.41 65.18,46.41 66.88,44.7 v1(66.88,44.2)
  IS4 w0.152: v1(80.65,6.99) 80.65,36.2 v1(79.5,37.34)
  BOTTOM w0.152: v1(79.5,37.34) 79.2,37.64 75.59,37.64 71.48,41.76 71.48,44.55 71.22,44.81 67.49,44.81 v1(66.88,44.2)
A13: length 111.5
  TOP w0.152: 79.38,9.53 v2(80.65,9.53) ; 79.38,9.53 79.38,36.35 80.11,37.08 80.11,41.38 v1(79.5,41.99) ; 79.38,9.53 J1.14 ; U16.2 v1(40.64,44.25) 40.01,43.61 40.01,34.92 40.64,34.29 U18.2 ; v1(77.47,52.17) U11.11 ; v1(65.58,44.2) U17.64
  IS3 w0.152: v1(65.58,44.2) 65.58,43.69 65.99,43.28 v1(73.41,43.28)
  IS4 w0.152: v1(77.47,52.17) 79.5,50.14 v1(79.5,41.99)
  BOTTOM w0.152: v1(79.5,41.99) 78.89,41.38 73.51,41.38 73.15,41.73 73.15,43.03 v1(73.41,43.28) ; v1(65.58,44.2) 64.97,43.59 63.83,43.59 63.58,43.84 63.58,44.55 63.32,44.81 41.2,44.81 v1(40.64,44.25)
A14: length 122.1
  TOP w0.152: U11.5 78.11,57.78 78.11,48.23 ; 78.11,48.23 78.11,8.89 ; 78.11,48.23 v1(78.71,48.23) ; 78.11,8.89 J1.15 ; 78.11,8.89 v2(76.84,8.89) ; 39.37,23.5 39.37,27.91 40.01,28.55 40.01,34.26 39.37,34.9 U16.26 39.37,39.6 v1(39.34,39.62) ; U17.65 v1(64.92,47.02)
  IS3 w0.152: v1(65.02,41.91) 63.37,40.26 56.92,40.26 56.29,39.62 v1(39.34,39.62)
  IS4 w0.152: v1(65.02,41.91) 64.92,42.01 v1(64.92,47.02)
  BOTTOM w0.152: v1(64.92,47.02) 65.84,47.93 78.41,47.93 v1(78.71,48.23)
A15: length 115.1
  TOP w0.152: v2(75.57,6.99) v1(76.84,6.99) J1.16 ; v1(64.8,36.45) 64.19,37.06 64.19,44.12 v1(64.26,44.2) U17.66 ; U10.11 v1(41.91,52.17) 41.25,51.51 41.25,41.15 40.64,40.54 U16.27 40.64,34.9 41.27,34.26 41.27,28.55 40.64,27.91 40.64,23.5
  IS3 w0.152: v1(64.8,36.45) 72.52,36.45 v1(73.41,37.34)
  IS4 w0.152: v1(76.84,6.99) 76.84,35.1 74.93,37.01 73.74,37.01 v1(73.41,37.34)
  BOTTOM w0.152: v1(64.26,44.2) 64.26,44.7 63.4,45.57 45.97,45.57 41.91,49.63 v1(41.91,52.17)
A16: length 37.8
  TOP w0.152: v1(61.67,44.2) U17.70 ; v2(43.18,60.96) v1(43.18,59.59) U10.5
  IS4 w0.152: v1(61.67,44.2) 61.67,52.32 61.52,52.48 61.52,58.37 v1(61.82,58.67)
  BOTTOM w0.152: v1(43.18,59.59) 44.09,58.67 v1(61.82,58.67)
A17: length 2.6
  TOP w0.152: U17.72 60.38,46.35 60.32,46.41 v2(60.32,48.26)
A18: length 2.8
  TOP w0.152: U17.73 59.72,46.35 59.69,46.38 59.69,46.99 59.05,47.62 v2(59.05,48.26)
A21: length 2.9
  TOP w0.152: v2(54.61,45.72) 54.61,44.45 55.52,43.54 U17.76
A23: length 33.1
  TOP w0.152: v2(81.28,35.56) U15.6 ; U17.80 v1(57.18,40.94)
  IS3 w0.152: U15.6 83.39,35.13 77.24,35.13 76.58,35.79 62.76,35.79 v1(61.98,36.58)
  IS4 w0.152: v1(61.98,36.58) 61.54,36.58 v1(57.18,40.94)
ADDR0: length 95.9
  TOP w0.152: 11.43,53.95 U1.6 ; 11.43,53.95 12.17,53.95 v1(13.21,54.99) ; 11.43,53.95 10.8,53.31 10.8,47.6 11.43,46.96 U2.6 11.43,41.25 10.8,40.61 10.8,34.9 11.43,34.26 U3.6 11.43,28.55 10.8,27.91 10.8,22.2 11.43,21.56 U4.6 ; U13.9 v1(63.5,52.17) v2(63.5,50.8)
  IS3 w0.152: v1(13.21,54.99) 13.82,54.38 53.01,54.38 53.49,53.9 61.77,53.9 v1(63.5,52.17)
ADDR1: length 99.6
  TOP w0.152: U4.7 10.16,21.56 9.53,22.2 9.53,27.91 10.16,28.55 U3.7 10.16,34.26 9.53,34.9 9.53,40.61 10.16,41.25 U2.7 10.16,46.96 9.53,47.6 9.53,53.31 10.16,53.95 v1(10.16,56.95) U1.7 ; v1(64.77,57.25) U13.7 v2(64.77,60.96)
  IS3 w0.152: v1(10.16,56.95) 10.46,56.64 28.3,56.64 28.55,56.9 28.55,57.66 29.06,58.17 61.47,58.17 61.57,58.06 63.96,58.06 v1(64.77,57.25)
ADDR2: length 86.6
  TOP w0.152: 8.89,54.56 9.19,54.56 v1(9.5,54.86) ; 8.89,54.56 8.89,53.95 8.25,53.31 8.25,47.6 8.89,46.96 U2.8 8.89,41.25 8.25,40.61 8.25,34.9 8.89,34.26 U3.8 8.89,28.55 8.25,27.91 8.25,22.2 8.89,21.56 U4.8 ; 8.89,54.56 U1.8 ; U12.9 v1(52.07,52.17) v2(52.07,50.8)
  IS3 w0.152: v1(52.07,52.17) 50.16,54.08 10.29,54.08 v1(9.5,54.86)
ADDR3: length 90.1
  TOP w0.152: U1.9 v1(7.62,56.18) 6.99,55.55 6.99,47.6 7.62,46.96 U2.9 7.62,41.25 6.99,40.61 6.99,34.9 7.62,34.26 U3.9 7.62,28.55 6.99,27.91 6.99,22.2 7.62,21.56 U4.9 ; v1(53.34,57.25) U12.7 v2(53.34,60.96)
  BOTTOM w0.152: v1(53.34,57.25) 52.73,57.86 9.3,57.86 v1(7.62,56.18)
ADDR4: length 103.9
  TOP w0.152: v1(6.35,51.05) U1.11 6.35,47.6 6.99,46.96 6.99,41.25 6.35,40.61 U2.11 6.35,34.9 6.99,34.26 6.99,28.55 6.35,27.91 6.35,23.5 ; v1(72.03,49.76) 74.93,52.65 U11.9 74.93,53.97 74.3,54.61 74.3,56.52 v2(73.66,57.15)
  IS3 w0.152: v1(6.35,51.05) 28.35,51.05 29.57,49.83 71.96,49.83 v1(72.03,49.76)
ADDR5: length 107.8
  TOP w0.152: v2(76.2,60.96) U11.7 v1(76.2,57.25) ; 7.62,23.5 7.62,27.91 8.25,28.55 8.25,34.26 7.62,34.9 U2.12 7.62,40.61 8.25,41.25 8.25,46.96 7.62,47.6 U1.12 7.62,52.55 v1(7.65,52.58)
  IS3 w0.152: v1(76.2,57.25) 76.2,57.51 74.73,58.98 67.06,58.98 66.75,59.28 61.57,59.28 60.76,58.47 10.8,58.47 7.65,55.32 v1(7.65,52.58)
ADDR6: length 62.8
  TOP w0.152: U10.9 v1(39.37,52.17) 39.37,51.43 v2(38.73,50.8) ; v1(8.86,51.82) 8.89,51.79 U1.13 8.89,47.6 9.53,46.96 9.53,41.25 8.89,40.61 U2.13 8.89,34.9 9.53,34.26 9.53,28.55 8.89,27.91 8.89,23.5
  IS3 w0.152: v1(8.86,51.82) 39.01,51.82 v1(39.37,52.17)
ADDR7: length 66.1
  TOP w0.152: v1(38.15,52.78) 38.15,53.34 38.1,53.39 v2(38.1,53.97) ; 10.16,23.5 10.16,27.91 10.8,28.55 10.8,34.26 10.16,34.9 U2.14 10.16,40.61 10.8,41.25 10.8,46.96 10.16,47.6 U1.14 10.16,52.55 v1(10.13,52.58) ; v1(40.64,57.25) U10.7
  IS3 w0.152: v1(10.13,52.58) 37.95,52.58 v1(38.15,52.78)
  IS4 w0.152: v1(40.64,57.25) 40.64,55.27 v1(38.15,52.78)
ADSL: length 56.8
  TOP w0.152: U17.16 v1(68.17,26.7) 68.17,33.12 73.76,38.71 v1(73.76,41.99) ; v2(66.68,9.53) v1(66.68,6.99) J1.24
  IS4 w0.152: v1(66.68,6.99) 66.68,23.47 66.83,23.62 66.83,25.35 v1(68.17,26.7)
  BOTTOM w0.152: v1(73.76,41.99) 74.68,41.99 75.54,42.85 83.49,42.85 U15.3
BHEL: length 46
  TOP w0.152: 70.48,6.35 v2(71.76,6.35) ; 70.48,6.35 70.48,2.54 ; 70.48,6.35 v1(70.48,6.99) ; v1(70.13,23.88) U17.19
  IS4 w0.152: v1(70.48,6.99) 70.48,14.48 71.09,15.09 71.09,22.91 v1(70.13,23.88)
  BOTTOM w0.152: U15.7 83.08,33.76 77.24,33.76 76.58,33.1 74.04,33.1 70.13,29.18 v1(70.13,23.88)
BLEL: length 67.4
  TOP w0.152: v1(74.93,27.33) 69.24,27.33 68.83,26.92 U17.17 ; v2(99.06,8.26) 98.43,7.62 v1(98.43,6.99) J1.1
  IS3 w0.152: U15.8 86.36,30.48 87.63,31.75 v1(98.43,31.75)
  IS4 w0.152: v1(98.43,6.99) v1(98.43,31.75)
  BOTTOM w0.152: v1(74.93,27.33) 75.31,26.95 84.4,26.95 84.81,27.36 84.81,29.49 U15.8
CAS0L: length 103.8
  TOP w0.152: 13.97,23.5 v1(13.97,22.33) 13.36,21.72 13.36,11.4 U4.17 ; v2(96.52,29.85) 94.62,29.85 U15.17
  IS3 w0.152: U15.17 92.74,29.24 65.18,29.24 64.49,29.92 56.92,29.92 56.34,30.51 46.76,30.51 v1(46.74,30.48)
  BOTTOM w0.152: v1(46.74,30.48) 16.48,30.48 15.85,29.85 15.85,24.21 v1(13.97,22.33)
CAS1L: length 102
  TOP w0.152: U1.17 13.97,48.34 13.36,47.73 13.36,36.8 U2.17 v1(13.97,35.03) ; U15.18 v2(98.43,33.02)
  IS3 w0.152: v1(13.97,35.03) 16.08,32.92 44.48,32.92 45.31,32.08 46.15,32.08 47.17,33.1 56.36,33.1 56.92,32.54 57.43,32.54 58.72,31.24 83.24,31.24 83.41,31.42 85.39,31.42 87,33.02 U15.18
CLK2: length 124.1
  TOP w0.152: v2(17.14,6.99) v1(15.88,6.99) J1.62 ; v1(70.48,16.61) 70.48,17.78 ; v1(66.88,41.91) 66.88,27.64 67.51,27 U17.15 v1(67.51,23.88)
  IS3 w0.152: v1(24.13,16.76) 24.89,16 69.88,16 v1(70.48,16.61)
  IS4 w0.152: v1(66.88,41.91) 68.78,43.81 68.78,46.1 69.44,46.76 69.44,48.69 v1(69.6,48.84) ; v1(67.51,23.88) 70.48,20.9 v1(70.48,16.61)
  BOTTOM w0.152: v1(69.6,48.84) 83.24,48.84 U15.1 R1.2 ; v1(24.13,16.76) 17.83,16.76 15.88,14.81 v1(15.88,6.99)
CLRCNT: length 42.9
  TOP w0.152: U14.12 81.28,15.34 v1(82.55,16.61) U14.2 ; v2(96.52,38.73) 95.89,39.37 94.62,39.37 93.98,40 U15.21
  IS4 w0.152: U15.21 86.28,40.64 84.76,39.12 84.76,37.52 83.74,36.5 83.24,36.5 82.55,35.81 v1(82.55,16.61)
D0: length 44.7
  TOP w0.152: v1(58.42,23.88) U17.1 ; U9.9 v1(22.86,19.15) 22.86,19.05 22.22,18.41 v2(20.32,18.41)
  BOTTOM w0.152: v1(22.86,19.15) 23.67,18.34 47.35,18.34 48.87,19.86 55.88,19.86 58.42,22.4 v1(58.42,23.88)
D1: length 41.8
  TOP w0.152: 57.15,27.94 57.15,27.69 56.77,27.3 55.88,27.3 v2(55.24,26.67) ; 57.15,27.94 v1(57.18,27.94) ; 57.15,27.94 U17.100 ; v1(24.13,19.15) U9.8
  IS3 w0.152: v1(57.18,27.94) 56.57,27.33 40.08,27.33 v1(39.98,27.43)
  BOTTOM w0.152: v1(39.98,27.43) 36.4,23.85 28.83,23.85 v1(24.13,19.15)
D2: length 41.9
  TOP w0.152: v1(54.36,28.6) U17.99 ; v2(20.32,17.14) 20.95,17.14 21.59,17.78 24.77,17.78 25.4,18.41 v1(25.4,19.15) U9.7
  BOTTOM w0.152: v1(54.36,28.6) 45.29,28.6 40.23,23.55 29.79,23.55 v1(25.4,19.15)
D3: length 44.8
  TOP w0.152: v1(26.67,19.15) U9.6 ; v1(57.4,26.67) 57.15,26.42 v2(57.15,25.4) ; U17.96 v1(57.18,30.53)
  IS3 w0.152: v1(57.4,26.67) 29.26,26.67 26.67,24.08 v1(26.67,19.15)
  IS4 w0.152: v1(57.18,30.53) 57.78,29.92 57.78,27.05 v1(57.4,26.67)
D4: length 41.5
  TOP w0.152: v2(52.7,27.3) 52.7,26.16 52.83,26.04 v1(52.83,25.83) ; v1(27.94,19.15) U9.5 ; v1(54.36,31.19) U17.95
  IS3 w0.152: v1(52.83,25.83) 52.35,26.31 30.48,26.31 27.94,23.77 v1(27.94,19.15)
  IS4 w0.152: v1(54.36,31.19) 54.97,30.58 54.97,27.97 v1(52.83,25.83)
D5: length 46.1
  TOP w0.152: v2(53.34,22.23) 53.34,23.98 v1(53.75,24.38) ; U17.94 v1(57.18,31.85) ; v1(29.21,19.15) U9.4
  IS4 w0.152: v1(57.18,31.85) 57.78,32.46 57.78,33.48 57.51,33.76 56.74,33.76 55.27,32.28 55.27,25.91 v1(53.75,24.38)
  BOTTOM w0.152: v1(29.21,19.15) 29.21,20.7 31.75,23.24 43.08,23.24 44.22,24.38 v1(53.75,24.38)
D6: length 38.4
  TOP w0.152: v1(51.41,31.24) 51.54,31.12 v2(52.7,31.12) ; v1(54.36,32.49) U17.93 ; v1(30.48,19.15) U9.3
  IS3 w0.152: v1(51.41,31.24) 52.65,32.49 v1(54.36,32.49)
  IS4 w0.152: v1(51.41,22.86) v1(51.41,31.24)
  BOTTOM w0.152: v1(30.48,19.15) 34.26,22.94 51.33,22.94 v1(51.41,22.86)
D7: length 47.2
  TOP w0.152: U9.2 v1(31.75,19.15) 31.75,14.61 32.38,13.97 v2(34.29,13.97) ; U17.92 v1(57.18,33.15)
  IS4 w0.152: v1(55.88,21.34) 55.88,31.85 v1(57.18,33.15)
  BOTTOM w0.152: v1(55.88,21.34) 33.93,21.34 v1(31.75,19.15)
D8: length 63.5
  TOP w0.152: v2(22.86,60.96) U8.9 v1(22.86,57.25) ; U17.90 v1(57.18,34.44)
  IS4 w0.152: v1(22.86,57.25) 23.47,56.64 23.47,33.93 v1(23.88,33.53)
  BOTTOM w0.152: v1(23.88,33.53) 44.81,33.53 45.29,34.01 46.38,34.01 47.22,33.17 55.91,33.17 v1(57.18,34.44)
D9: length 57.6
  TOP w0.152: v1(24.13,57.25) U8.8 v2(24.13,60.96) ; v1(54.36,35.1) U17.89
  IS4 w0.152: v1(24.54,35.81) 24.74,36.02 24.74,56.64 v1(24.13,57.25)
  BOTTOM w0.152: v1(54.36,35.1) 53.82,34.57 43.43,34.57 42.19,35.81 v1(24.54,35.81)
D10: length 59.4
  TOP w0.152: v1(25.4,57.25) U8.7 v2(25.4,60.96) ; U17.88 v1(57.18,35.74)
  IS3 w0.152: v1(57.18,35.74) 47.42,35.74 46.66,36.5 27.61,36.5 v1(26.16,35.05)
  IS4 w0.152: v1(25.4,57.25) 25.4,50.93 26.01,50.32 26.01,35.2 v1(26.16,35.05)
D11: length 52.4
  TOP w0.152: v1(54.36,36.4) U17.87 ; v1(26.67,57.25) U8.6 v2(26.67,60.96)
  IS4 w0.152: v1(26.67,57.25) 27.28,56.64 27.28,42.54 v1(27.91,41.91)
  BOTTOM w0.152: v1(54.36,36.4) 54.2,36.55 28.93,36.55 27.91,37.57 v1(27.91,41.91)
D12: length 53.5
  TOP w0.152: v2(27.94,60.96) U8.5 v1(27.94,57.25) ; U17.86 v1(57.18,37.03)
  IS4 w0.152: v1(27.94,57.25) 28.55,56.64 v1(28.55,37.97)
  BOTTOM w0.152: v1(28.55,37.97) 29.49,37.03 v1(57.18,37.03)
D13: length 46.8
  TOP w0.152: v2(29.21,60.96) U8.4 v1(29.21,57.25) ; v1(54.36,38.99) U17.83
  IS3 w0.152: v1(29.21,57.25) 31.45,55.02 53.24,55.02 v1(53.75,54.51)
  IS4 w0.152: v1(54.36,38.99) 53.75,39.6 53.75,43.15 53.95,43.36 53.95,54.31 v1(53.75,54.51)
D14: length 46.4
  TOP w0.152: v2(30.48,60.96) U8.3 v1(30.48,57.25) ; U17.82 v1(57.18,39.65)
  BOTTOM w0.152: v1(30.48,57.25) 30.48,44.65 33.12,42.01 46.89,42.01 49.25,39.65 v1(57.18,39.65)
D15: length 40.3
  TOP w0.152: v2(31.75,60.96) U8.2 v1(31.75,57.25) ; v1(54.36,40.28) U17.81
  BOTTOM w0.152: v1(54.36,40.28) 53.82,40.28 51.23,42.88 36.93,42.88 34.39,45.42 34.39,49.83 31.75,52.48 v1(31.75,57.25)
DATA0: length 84.5
  TOP w0.152: J1.28 v1(61.59,6.99) v2(62.87,6.99) ; v1(21.59,9.63) U9.11 21.59,14.58 v1(22.25,15.24) ; v1(16.51,9.63) U4.19 ; v1(29.21,31.85) U18.11
  IS3 w0.152: v1(21.59,9.63) 22.2,10.24 58.34,10.24 v1(61.59,6.99)
  IS4 w0.152: v1(29.21,31.85) 28.3,32.77 24.79,32.77 22.25,30.23 v1(22.25,15.24)
  BOTTOM w0.152: v1(21.59,9.63) 20.98,9.02 17.12,9.02 v1(16.51,9.63)
DATA1: length 82.3
  TOP w0.152: v1(27.94,31.85) U18.12 ; v2(60.32,8.26) v1(60.32,6.99) 60.32,2.54 ; v1(22.86,9.63) U9.12 22.86,15.72 v1(23.11,15.98) ; v1(15.24,9.63) U4.18
  IS3 w0.152: 22.86,9.02 27.41,9.02 30.05,6.38 59.72,6.38 v1(60.32,6.99) ; 22.86,9.02 v1(22.86,9.63) ; 22.86,9.02 15.85,9.02 v1(15.24,9.63)
  IS4 w0.152: v1(27.94,31.85) 27.33,32.46 24.99,32.46 23.47,30.94 23.47,16.33 v1(23.11,15.98)
DATA2: length 79.1
  TOP w0.152: v1(16.51,19.15) U4.2 ; J1.30 v1(59.05,6.99) v2(59.05,8.26) ; v1(26.67,31.85) U18.13 ; v1(24.13,9.63) U9.13
  IS3 w0.152: v1(59.05,6.99) 58.45,7.59 30.58,7.59 28.55,9.63 v1(24.13,9.63)
  IS4 w0.152: 24.13,14.63 19.15,14.63 16.51,17.27 v1(16.51,19.15) ; 24.13,14.63 24.74,15.24 24.74,29.92 v1(26.67,31.85) ; 24.13,14.63 v1(24.13,9.63)
DATA3: length 65.2
  TOP w0.152: 26.04,21.18 26.04,21.56 25.4,22.2 25.4,23.5 ; 26.04,21.18 18.64,21.18 U4.1 ; 26.04,21.18 26.04,13.64 v1(25.4,13) U9.14 ; v1(57.4,11.43) 57.78,11.05 57.78,10.16 ; v2(56.52,10.16) 57.78,10.16 ; 57.78,10.16 57.78,2.54
  IS3 w0.152: v1(57.4,11.43) 56.9,10.92 27.48,10.92 v1(25.4,13)
DATA4: length 63.1
  TOP w0.152: J1.32 56.52,7.24 53.98,9.78 52.22,9.78 ; v1(52.07,9.63) 52.22,9.78 ; 52.22,9.78 52.22,9.53 52.07,9.53 v2(52.07,8.26) ; 16.51,23.5 16.51,23.75 17.12,24.36 26.06,24.36 26.67,23.75 26.67,22.2 27.3,21.56 27.3,13.64 v1(26.67,13) U9.15
  BOTTOM w0.152: v1(26.67,13) 29.06,10.62 51.08,10.62 v1(52.07,9.63)
DATA5: length 72.2
  TOP w0.152: 55.24,2.54 v1(55.24,6.99) ; v2(24.13,25.4) 25.15,25.4 v1(25.4,25.15) 26.54,25.15 27.94,23.75 27.94,22.2 28.57,21.56 28.57,13.64 v1(27.94,13) U9.16 ; v1(15.24,22.33) 15.24,23.5
  IS3 w0.152: v1(25.4,25.15) 18.06,25.15 v1(15.24,22.33) ; v1(27.94,13) 28.55,12.4 52.58,12.4 v1(55.42,15.24)
  IS4 w0.152: v1(55.24,6.99) 55.42,7.16 v1(55.42,15.24)
DATA6: length 66.9
  TOP w0.152: U9.17 v1(29.21,13) 29.84,13.64 29.84,21.56 29.21,22.2 29.21,24.31 26.92,26.59 19.05,26.59 16.51,29.13 U3.2 ; v2(53.98,8.26) v1(53.98,6.99) J1.34
  BOTTOM w0.152: v1(53.98,6.99) 53.98,9.14 52.2,10.92 31.29,10.92 v1(29.21,13)
DATA7: length 64.9
  TOP w0.152: 23.29,31.85 30.48,24.66 30.48,22.2 31.11,21.56 31.11,15.85 30.48,15.21 U9.18 30.48,9.4 v1(30.73,9.14) ; 23.29,31.85 23.29,31.75 23.49,31.75 v2(23.49,28.57) ; 23.29,31.85 18.95,31.85 U3.1 ; 52.7,2.54 v1(52.7,6.99)
  IS3 w0.152: v1(30.73,9.14) 30.86,9.02 52.83,9.02 v1(52.98,9.17)
  IS4 w0.152: v1(52.7,6.99) 52.98,7.26 v1(52.98,9.17)
DATA8: length 91.1
  TOP w0.152: U2.19 16.51,38.71 21.59,43.79 v1(21.59,47.73) U8.11 ; v2(50.8,8.26) 50.8,7.62 v1(51.44,6.99) J1.36 ; v1(29.21,44.55) U16.11
  IS3 w0.152: v1(52.07,42.9) 52.04,42.88 30.89,42.88 v1(29.21,44.55)
  IS4 w0.152: v1(51.44,6.99) 51.44,11.76 52.07,12.4 v1(52.07,42.9)
  BOTTOM w0.152: v1(29.21,44.55) 25.43,48.34 22.2,48.34 v1(21.59,47.73)
DATA9: length 89.5
  TOP w0.152: v1(27.94,44.55) U16.12 ; U2.18 v1(15.24,43.43) ; v2(49.53,8.26) 49.53,7.62 v1(50.16,6.99) 50.16,2.54 ; v1(22.86,47.73) U8.12
  IS3 w0.152: 22.86,43.94 27.94,43.94 ; 22.86,43.94 22.35,43.43 v1(15.24,43.43) ; 22.86,43.94 v1(22.86,47.73) ; 27.94,43.94 v1(27.94,44.55) ; 27.94,43.94 28.17,43.94 29.84,42.27 v1(47.5,42.27)
  IS4 w0.152: v1(50.16,6.99) 50.16,39.6 v1(47.5,42.27)
DATA10: length 84.1
  TOP w0.152: v1(26.67,44.55) U16.13 ; J1.38 v1(48.89,6.99) 48.26,7.62 v2(48.26,8.26) ; v1(24.13,47.73) U8.13 ; v1(16.51,44.55) U2.2
  IS3 w0.152: v1(46.74,46.48) 46.41,46.15 28.27,46.15 v1(26.67,44.55)
  IS4 w0.152: v1(46.74,46.48) 46.74,35.71 48.89,33.55 v1(48.89,6.99)
  BOTTOM w0.152: 24.66,45.72 24.66,47.19 v1(24.13,47.73) ; 24.66,45.72 17.68,45.72 v1(16.51,44.55) ; 24.66,45.72 25.5,45.72 v1(26.67,44.55)
DATA11: length 82.6
  TOP w0.152: 47.62,2.54 v1(47.62,6.99) ; 25.4,40.61 25.37,40.64 v2(24.13,40.64) ; 25.4,40.61 U16.15 25.4,34.92 26.04,34.29 v1(27.53,34.29) ; 25.4,40.61 26.04,41.25 26.04,46.96 25.4,47.6 U8.14 v1(25.4,50.06) ; v1(17.78,44.55) U2.1
  IS3 w0.152: v1(25.4,50.06) 24.23,50.06 22.2,48.03 22.2,47.45 19.3,44.55 v1(17.78,44.55) ; v1(27.53,34.29) 28.24,33.58 28.7,33.58 29.08,33.96 v1(47.5,33.96)
  IS4 w0.152: v1(47.62,6.99) 47.62,33.83 v1(47.5,33.96)
DATA12: length 79.7
  TOP w0.152: U16.16 26.67,37.36 ; 26.67,37.36 26.67,40.61 27.3,41.25 27.3,46.96 26.67,47.6 U8.15 v1(26.67,50.06) ; 26.67,37.36 v1(27.28,37.36) ; v1(16.51,47.73) U1.19 16.51,49.53 17.14,50.16 v2(19.05,50.16) ; J1.40 v1(46.35,6.99)
  IS3 w0.152: v1(26.67,50.06) 26.06,50.67 19.46,50.67 v1(16.51,47.73)
  IS4 w0.152: v1(27.28,37.36) 29.87,34.77 29.87,13.69 v1(33.93,9.63)
  BOTTOM w0.152: v1(33.93,9.63) 43.71,9.63 v1(46.35,6.99)
DATA13: length 84.2
  TOP w0.152: v1(27.94,50.06) U8.16 27.94,47.6 28.57,46.96 28.57,41.25 27.94,40.61 U16.17 28.45,35.69 v1(28.45,34.29) ; 45.09,12.07 v2(43.81,12.07) v2(42.55,12.07) ; 45.09,12.07 J1.41 ; 45.09,12.07 45.09,19.53 43.79,20.83 v1(43.79,35.81) ; v1(15.24,47.73) U1.18
  IS3 w0.152: v1(43.79,35.81) 29.97,35.81 v1(28.45,34.29)
  BOTTOM w0.152: v1(15.24,47.73) 18.19,50.67 27.33,50.67 v1(27.94,50.06)
DATA14: length 74
  TOP w0.152: 43.81,7.62 v2(43.81,8.89) ; 43.81,7.62 J1.42 ; 43.81,7.62 43.18,7.62 32.41,18.39 32.41,24.33 29.92,26.82 29.92,33.63 29.21,34.34 U16.18 29.21,40.61 29.84,41.25 29.84,46.96 29.21,47.6 U8.17 29.21,49.71 26.92,51.99 19.05,51.99 16.51,54.53 U1.2
DATA15: length 76.5
  TOP w0.152: U1.1 19.56,56.64 27.43,56.64 29.97,54.1 29.97,49.4 U8.18 30.48,47.6 31.11,46.96 31.11,41.25 30.48,40.61 U16.19 30.81,35.86 30.81,34.01 31.19,33.63 31.19,32.16 31.5,31.85 v1(33.02,31.85) ; v2(41.27,6.99) v1(42.55,6.99) J1.43
  IS4 w0.152: v1(33.02,31.85) 38.3,31.85 42.55,27.61 v1(42.55,6.99)
HLDA: length 130.6
  TOP w0.152: v1(46.99,57.25) U10.2 ; v1(71.12,57.25) U13.2 ; v1(82.55,57.25) U11.2 ; U12.2 v1(59.69,57.25) 57.81,55.37 57.81,28.83 59.72,26.92 U17.3 v1(59.72,23.88) ; J1.25 v1(65.41,6.99) v2(64.14,6.99) ; U6.1 v1(53.34,18.95)
  IS3 w0.152: v1(46.99,57.25) 47.6,57.86 59.08,57.86 v1(59.69,57.25)
  IS4 w0.152: v1(65.41,6.99) 65.41,15.75 64.8,16.36 64.8,18.8 v1(59.72,23.88) ; U15.4 82.88,41.58 82.88,48.67 83.16,48.95 83.16,56.64 v1(82.55,57.25)
  BOTTOM w0.152: 71.12,57.86 81.94,57.86 v1(82.55,57.25) ; 71.12,57.86 v1(71.12,57.25) ; 71.12,57.86 60.3,57.86 v1(59.69,57.25) ; v1(53.34,18.95) 58.09,18.95 59.72,20.57 v1(59.72,23.88)
MIO: length 52.3
  TOP w0.152: 67.95,8.86 v2(67.95,10.79) v2(66.68,10.79) ; 67.95,8.86 J1.23 ; 67.95,8.86 71.09,12.01 71.09,19.56 72.72,21.18 U17.23 v1(72.72,26.7)
  IS4 w0.152: U15.5 82.88,39.04 74.24,39.04 72.72,37.52 v1(72.72,26.7)
MUXS0L: length 71
  TOP w0.152: v1(45.72,52.17) U10.14 ; v1(58.42,52.17) U12.14 ; v1(81.28,52.17) U11.14 ; v1(69.85,52.17) U13.14 ; U15.20 94.62,37.46 v2(96.52,37.46)
  IS4 w0.152: v1(81.28,52.17) 81.28,39.9 v1(81.03,39.65)
  BOTTOM w0.152: 69.85,52.78 80.67,52.78 v1(81.28,52.17) ; 69.85,52.78 58.42,52.78 ; 69.85,52.78 v1(69.85,52.17) ; v1(45.72,52.17) 46.33,52.78 58.42,52.78 ; U15.20 92.43,39.65 v1(81.03,39.65) ; 58.42,52.78 v1(58.42,52.17)
PCLK: length 116.2
  TOP w0.152: J1.64 v1(13.34,6.99) v2(14.61,6.99) ; U7.6 v1(67.95,18.95) ; U14.1 v1(83.82,18.95) 84.07,18.95 84.81,19.68 84.81,44.73 U15.2
  BOTTOM w0.152: 67.95,18.34 67.13,17.53 16.36,17.53 14.33,15.49 14.33,7.98 v1(13.34,6.99) ; 67.95,18.34 v1(67.95,18.95) ; 67.95,18.34 83.21,18.34 v1(83.82,18.95)
RA0: length 53.3
  TOP w0.152: 50.8,24.77 v2(52.07,24.77) ; 50.8,24.77 U6.3 ; 50.8,24.77 50.8,50.19 v1(50.55,50.44) ; v1(67.31,52.17) U13.12
  IS3 w0.152: v1(67.31,52.17) 67.31,51.16 66.6,50.44 v1(50.55,50.44)
RA1: length 61.4
  TOP w0.152: U6.4 49.53,55.12 50.14,55.73 v1(53.59,55.73) ; v1(68.58,57.25) U13.4 v2(68.58,60.96)
  IS3 w0.152: v1(53.59,55.73) 54.05,55.27 66.6,55.27 v1(68.58,57.25)
RA2: length 46.6
  TOP w0.152: v1(48.26,50.44) 48.26,23.5 ; 48.26,23.5 U6.5 ; 48.26,23.5 v2(46.99,23.5) ; v1(55.88,52.17) U12.12
  IS4 w0.152: v1(48.26,50.44) 52.93,55.12 54.1,55.12 U12.12 v1(55.88,52.17)
RA3: length 64.6
  TOP w0.152: v2(50.8,10.79) 51.44,11.43 51.97,11.43 v1(52.07,11.53) U6.13 52.07,15.09 54.36,17.37 54.36,27.71 53.75,28.32 53.75,50.44 55.22,51.92 55.22,59.79 55.63,60.2 56.13,60.2 57.15,59.18 U12.4 ; v1(46.99,16.61) U6.6
  BOTTOM w0.152: v1(52.07,11.53) 49.86,11.53 46.99,14.4 v1(46.99,16.61)
RA4: length 72
  TOP w0.152: v1(78.74,52.17) U11.12 ; v2(49.53,10.16) U6.11 49.53,12.93 50.16,13.56 50.16,49.96 49.94,50.19 49.94,51.05 v1(50.55,51.66)
  IS3 w0.152: v1(62.59,51.82) 62.33,51.56 50.65,51.56 v1(50.55,51.66)
  BOTTOM w0.152: v1(78.74,52.17) 78.13,51.56 62.84,51.56 v1(62.59,51.82)
RA5: length 81
  TOP w0.152: v2(48.26,10.16) U6.10 48.26,12.95 48.87,13.56 48.87,55.58 48.82,55.63 48.82,56.13 49.17,56.49 50.44,56.49 v1(50.55,56.39) ; v1(80.01,57.25) U11.4
  IS3 w0.152: v1(80.01,57.25) 79.4,56.64 75.79,56.64 75.54,56.9 75.54,57.61 75.29,57.86 65.63,57.86 65.38,57.61 65.38,56.85 65.02,56.49 50.65,56.49 v1(50.55,56.39)
RA6: length 47.7
  TOP w0.152: v2(46.99,10.16) v1(46.99,11.53) U6.9 ; v1(43.18,52.17) U10.12
  IS4 w0.152: v1(46.99,11.53) 46.38,10.92 45.47,10.92 43.69,12.7 43.69,28.19 43.18,28.7 v1(43.18,52.17)
RA7: length 51.7
  TOP w0.152: v2(46.35,8.89) 45.72,9.53 v1(45.72,11.53) U6.8 ; v1(44.45,57.25) U10.4
  IS4 w0.152: v1(44.45,57.25) 45.09,56.62 45.09,48.97 44.78,48.67 44.78,12.47 v1(45.72,11.53)
RASL: length 127.4
  TOP w0.152: U3.4 v1(13.97,31.85) 14.58,31.85 ; 14.58,31.85 14.58,20.93 U4.4 ; 14.58,31.85 14.58,45.16 ; U15.16 94.62,27.3 95.25,27.3 95.89,26.67 v2(97.79,26.67) ; 14.58,45.16 14.53,45.16 U2.4 ; 14.58,45.16 14.58,57.25 13.97,57.86 U1.4
  IS3 w0.152: U15.16 93.04,28.88 83.41,28.88 83.16,28.63 56.92,28.63 56.26,29.29 43.23,29.29 41.27,31.24 14.58,31.24 v1(13.97,31.85)
RDYL: length 109.4
  TOP w0.152: v1(18.54,18.29) 18.41,18.16 18.41,12.07 ; 18.41,12.07 J1.60 ; 18.41,12.07 v2(19.68,12.07) ; v1(62.33,23.88) U17.7
  IS3 w0.152: v1(62.33,23.88) 62.33,21.34 59.28,18.29 v1(18.54,18.29)
  BOTTOM w0.152: U15.19 92.99,36.55 83.39,36.55 83.19,36.35 76.81,36.35 74.85,34.39 62.84,34.39 62.33,33.88 v1(62.33,23.88)
REF: length 41.9
  TOP w0.152: v2(76.2,10.16) v1(76.2,11.53) U14.8 ; U17.4 v1(60.38,26.7)
  IS3 w0.152: v1(76.2,11.53) 75.59,12.14 75.59,25.4 ; 75.59,25.4 61.67,25.4 v1(60.38,26.7) ; 75.59,25.4 U15.10
RESET: length 94.9
  TOP w0.152: 22.22,6.99 20.95,8.26 v1(20.32,8.26) ; 22.22,6.99 v2(23.49,6.99) ; 22.22,6.99 22.22,2.54 ; U5.1 v1(63.5,18.95) ; v1(74.68,32.49) U17.33
  IS4 w0.152: v1(20.07,13.59) 20.32,13.34 v1(20.32,8.26) ; v1(61.21,16.61) 61.21,16.66 v1(63.5,18.95)
  BOTTOM w0.152: v1(61.21,16.61) 60.6,17.22 38.4,17.22 34.8,13.61 20.09,13.61 v1(20.07,13.59) ; 78.11,27.94 U15.9 ; 78.11,27.94 78.11,29.06 v1(74.68,32.49) ; 78.11,27.94 74.35,27.94 73.33,26.92 73.33,22.86 70.03,19.56 64.11,19.56 v1(63.5,18.95)
RESETL: length 11.7
  TOP w0.152: v1(62.23,16.61) U5.2 ; U7.5 v1(69.22,18.95) v2(69.22,20.32)
  IS3 w0.152: v1(62.23,16.61) 62.84,17.22 67.49,17.22 v1(69.22,18.95)
ROMOEL: length 80
  TOP w0.152: U16.22 34.29,34.9 34.92,34.26 34.92,26.34 v1(34.29,25.7) 34.29,23.5 ; v1(92.68,27.33) 92.68,26.7 U15.15 93.98,24.77 94.62,24.13 95.89,24.13 v2(96.52,23.5)
  IS3 w0.152: v1(92.68,27.33) 92.35,27 83.41,27 82.47,27.94 60.76,27.94 59.69,26.87 59.69,26.37 58.42,25.1 34.9,25.1 v1(34.29,25.7)
UN1F39330PQ0: length 13.6
  TOP w0.152: v1(77.47,16.61) U14.6 ; U14.13 v1(82.55,11.53) 82.45,11.43 81.92,11.43 v2(81.28,10.79)
  BOTTOM w0.152: v1(77.47,16.61) 81.69,16.61 82.55,15.75 v1(82.55,11.53)
UN127C25637PVPP0: length 14.5
  TOP w0.152: U18.1 41.91,34.26 41.27,34.9 41.27,40.61 41.91,41.25 41.91,41.27 ; 41.91,41.27 U16.1 ; 41.91,41.27 v2(43.18,41.27)
WEL: length 129.1
  TOP w0.152: 15.85,44.55 v1(15.24,44.55) U2.3 ; 15.85,44.55 15.85,57.25 15.24,57.86 U1.3 ; 15.85,44.55 15.85,32.46 ; 15.85,32.46 15.8,32.46 U3.3 ; 15.85,32.46 15.85,20.93 U4.3 ; U15.22 94.62,42.54 95.25,42.54 95.89,41.91 v2(97.79,41.91)
  IS3 w0.152: v1(82.27,41.91) 81.74,41.38 70.51,41.38 69.37,42.52 58.75,42.52 57.78,41.55 55.22,41.55 54.97,41.3 16.41,41.3 14.63,43.08 14.63,43.94 v1(15.24,44.55)
  BOTTOM w0.152: v1(82.27,41.91) 92.71,41.91 U15.22
WR: length 130.3
  TOP w0.152: 71.76,7.59 v2(71.76,9.53) ; 71.76,7.59 70.23,7.59 69.22,6.58 J1.22 ; 71.76,7.59 75.54,11.38 75.54,23.88 U17.25 v1(74.02,26.7) ; v1(33.02,19.15) U9.1 ; v1(33.02,57.25) U8.1
  IS3 w0.152: v1(33.02,19.15) 47.6,19.15 48.01,19.56 59.08,19.56 61.62,22.1 61.62,24.23 61.87,24.49 72.57,24.49 73.94,23.11 v1(73.94,22.86)
  IS4 w0.152: v1(33.02,19.15) 32.41,19.76 32.41,56.64 v1(33.02,57.25)
  BOTTOM w0.152: 74.63,22.86 74.63,26.09 v1(74.02,26.7) ; 74.63,22.86 v1(73.94,22.86) ; 74.63,22.86 U15.11

## Copper pours and planes (outline as drawn; the poured copper is in the pictures)
GND on GND (solid shape): 96.52,60.96 99.06,58.42 100.33,58.42 100.33,6.99 99.06,6.99 99.06,1.91 86.36,1.91 86.36,7.62 83.82,7.62 83.82,1.91 21.59,1.91 21.59,7.62 19.05,7.62 19.05,1.91 5.08,1.91 5.08,7.62 2.54,10.16 1.27,10.16 1.27,57.15 6.35,62.23 96.52,62.23
VCC on VCC (solid shape): 100.33,57.15 100.33,8.26 99.06,6.99 99.06,6.35 87,6.35 86.36,6.99 86.36,7.62 83.82,7.62 83.82,6.35 22.22,6.35 21.59,6.99 21.59,7.62 19.05,7.62 19.05,6.35 5.08,6.35 4.45,6.99 4.45,8.26 1.27,11.43 1.27,57.15 6.35,62.23 95.25,62.23
